# Altium PCB Industrial_IOT_Dev_Brd-v1.0.PcbDoc (part 5 of 8)
Units mil, origin at the board's own origin, x right, y up, seen from the top; angles counter-clockwise.
Board outline 6299.21 x 4724.41 mil, 4 copper layers (Top Layer, Layer 1, Layer 2, Bottom Layer), stack 62.047 mil thick; 376 components, 240 nets, 1129 pads, 635 vias.
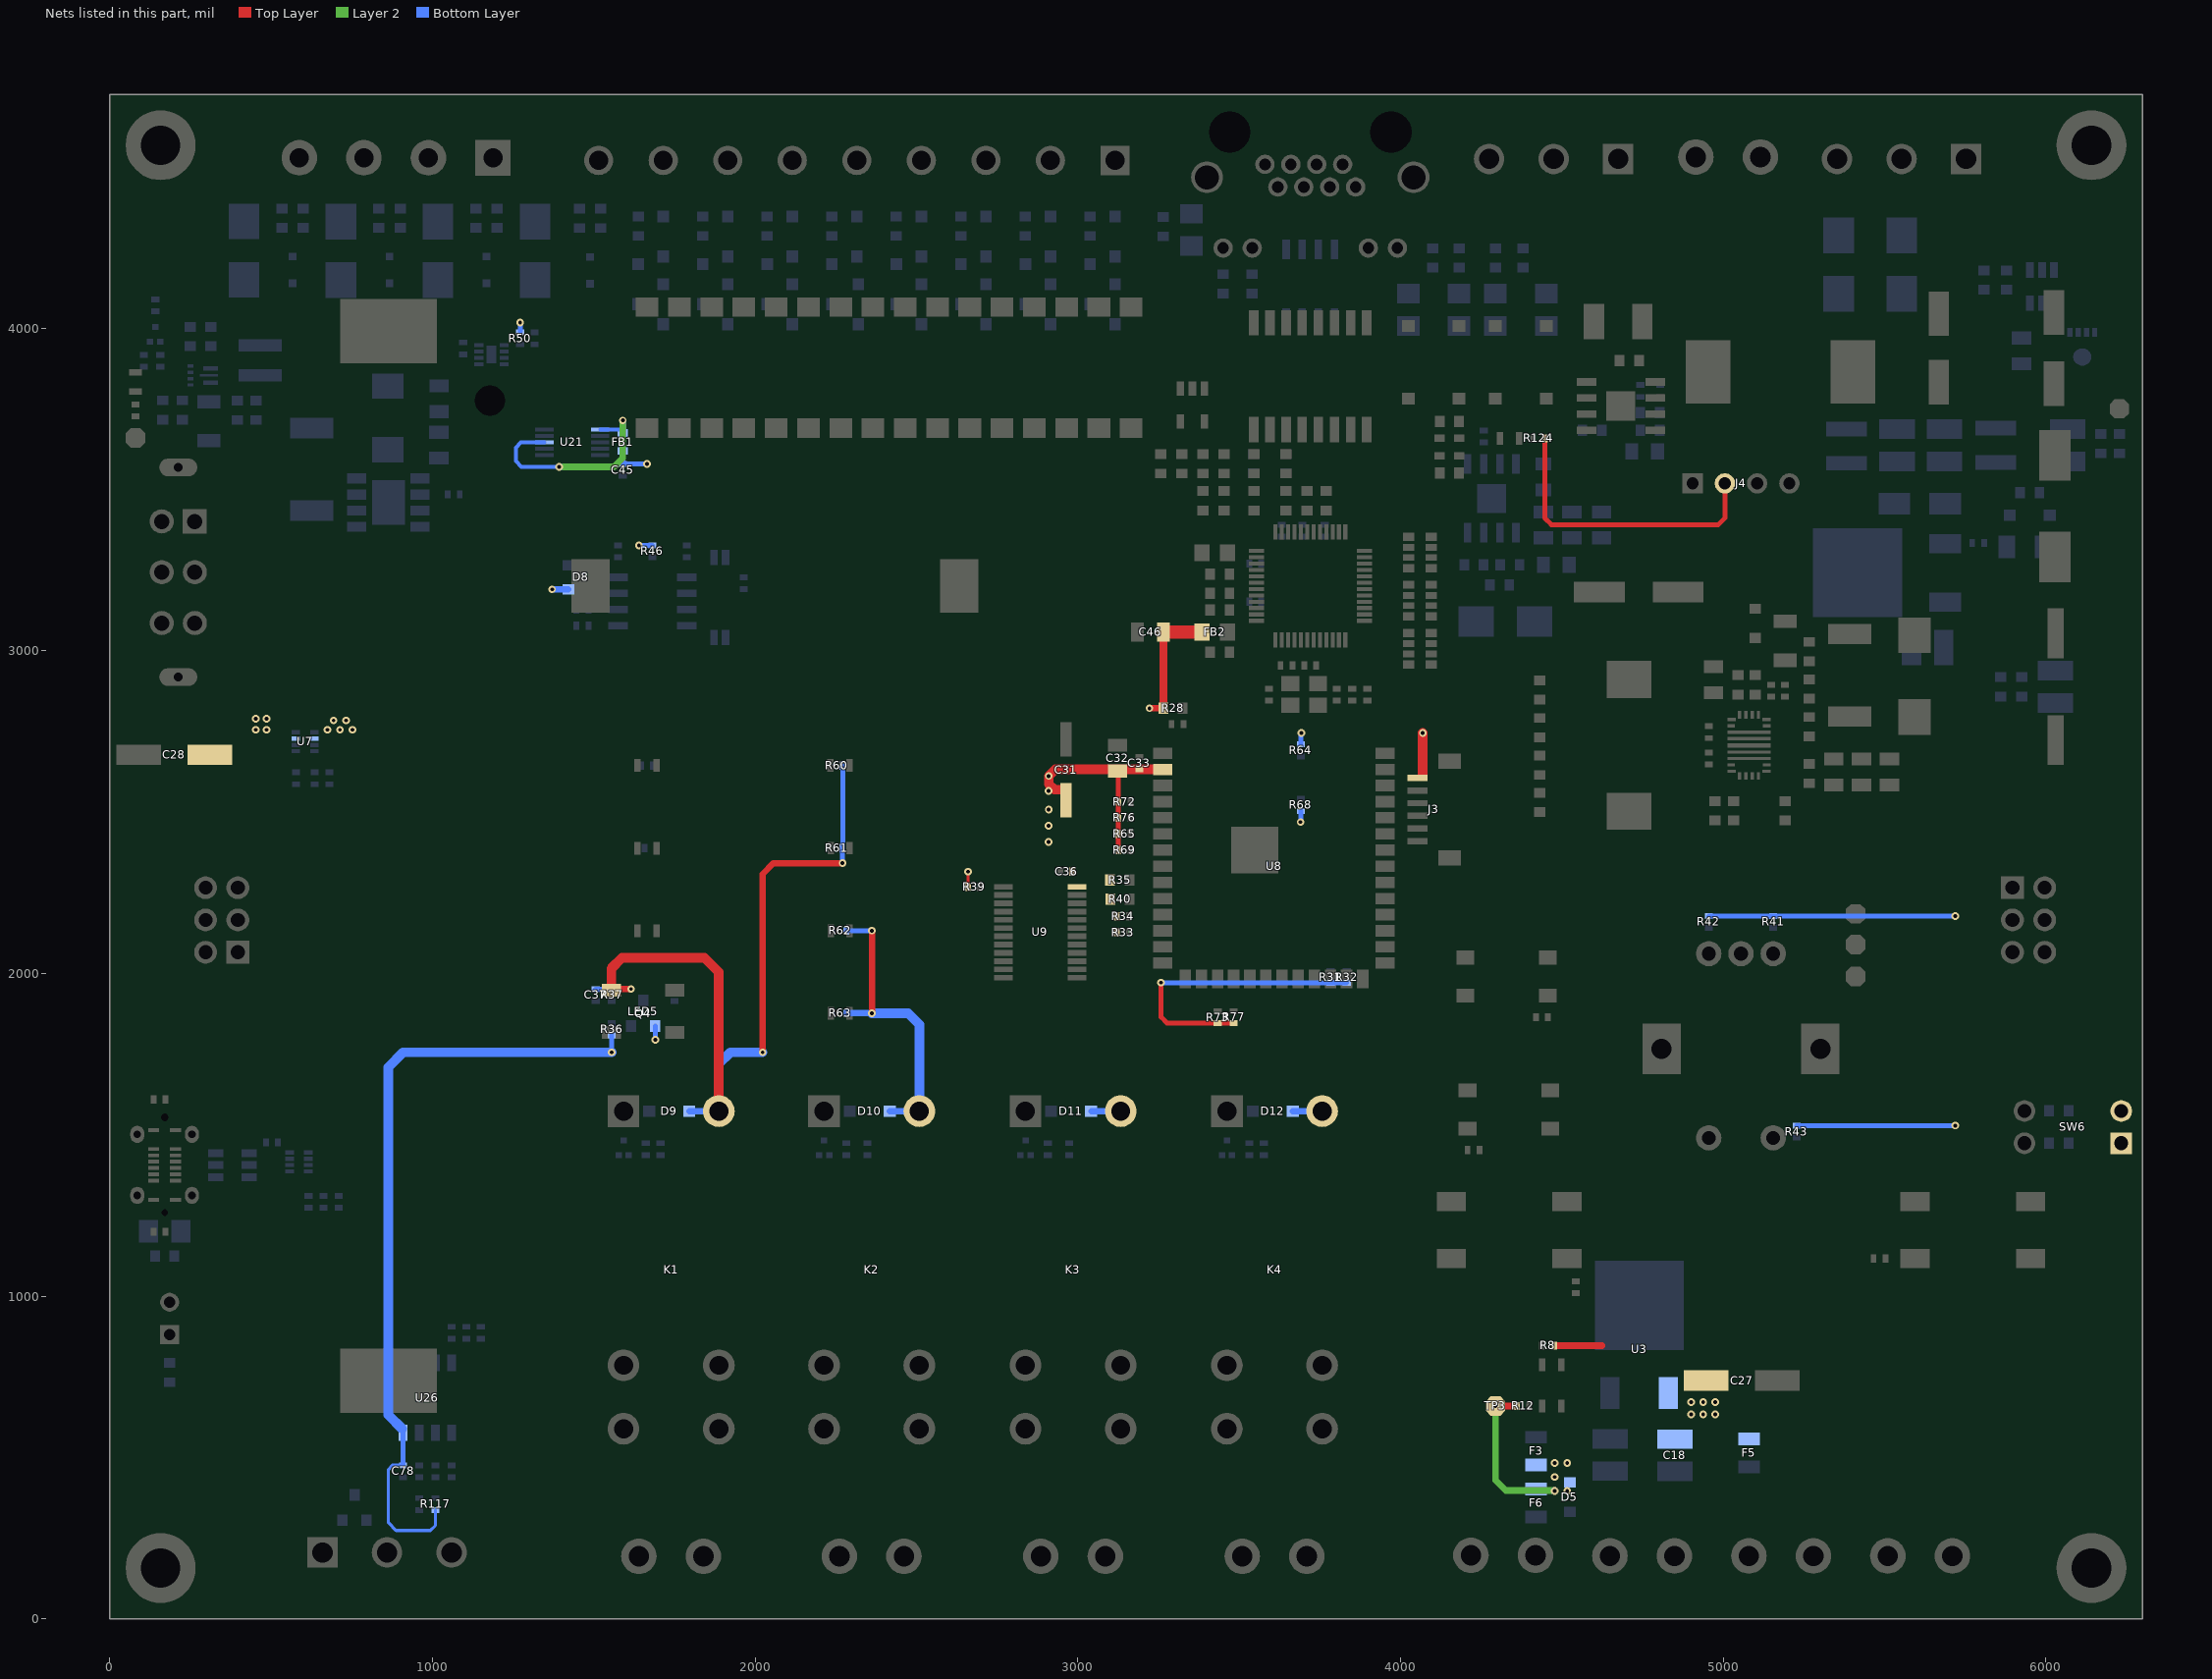
[diagram p4: the nets of this part, all layers, seen from the top]

## Part data (continued)
R103: library part RC0603FR-0712K4L, "RES SMD 12.4K OHM 1% 1/10W 0603", Case Code (Imperial)=0603, Case Code (Metric)=1608, LCSC Part Number=C137798, Manufacturer=Yageo, Max Operating Temperature=155°C, Max Power Dissipation=100mW, Min Operating Temperature=-55°C, Package Quantity=1, Resistance=12.4kR, Resistor Type="Thick Film", Supplier Part Number 1=311-12.4KHRCT-ND, Temperature Coefficient=100ppm/°C, Tolerance=1%, Voltage Rating=50V, Working Voltage=75V, Case/Package=0603, Category="Chip SMD Resistors", ComponentLink1Description=https://datasheet.ciiva.com/2454/pyu-r-int-thick-7-2454069.pdf?src-supplier=Digi-Key, ComponentLink1URL=https://datasheet.ciiva.com/2454/pyu-r-int-thick-7-2454069.pdf?src-supplier=Digi-Key, ComponentLink2Description=https://datasheet.ciiva.com/2454/pyu-r-int-thick-7-2454070.pdf?src-supplier=Digi-Key, ComponentLink2URL=https://datasheet.ciiva.com/2454/pyu-r-int-thick-7-2454070.pdf?src-supplier=Digi-Key, ComponentLink3Description=https://datasheet.ciiva.com/2454/pyu-r-int-thick-7-2454071.pdf?src-supplier=Digi-Key, ComponentLink3URL=https://datasheet.ciiva.com/2454/pyu-r-int-thick-7-2454071.pdf?src-supplier=Digi-Key, Construction=Rectangular, Depth=0.8mm, Features="Moisture Resistant", Height=0.022inch, Lead Free="Lead Free", Length=0.063inch, Manufacturer Part Number=RC0603FR-0712K4L, Military Standard=Not, Number of Terminations=2, Packaging="Tape and Reel", Power Rating=100mW, Pricing 1="1=0.10000, 10=0.02400, 100=0.00970, 1000=0.00436, 2500=0.00378 (USD)", RoHS=Yes, RoHS Compliant=Yes, Series=RC, Stock 1=494008, Supplier 1=Digi-Key, Technology="THICK FILM", Termination=SMD/SMT, Voltage Rating (DC)=50V, Width=0.031inch
R106 R112: library part RC0805FR-070RL, "RES 0 OHM JUMPER 1/8W 0805", Case Code (Imperial)=0805, Case Code (Metric)=2012, LCSC Part Number=C100045, Manufacturer=Yageo, Max Operating Temperature=155°C, Max Power Dissipation=125mW, Min Operating Temperature=-55°C, Resistance=0mR, Resistor Type="Thick Film", Tolerance=1%, Case/Package=0805, Category="Chip SMD Resistors", ComponentLink1Description=https://datasheet.ciiva.com/15189/getdatasheetpartid-348154-15189885.pdf?src-supplier=Verical, ComponentLink1URL=https://datasheet.ciiva.com/15189/getdatasheetpartid-348154-15189885.pdf?src-supplier=Verical, ComponentLink2Description=https://datasheet.ciiva.com/17042/rc0805-17042698.pdf?src-supplier=Future+Electronics, ComponentLink2URL=https://datasheet.ciiva.com/17042/rc0805-17042698.pdf?src-supplier=Future+Electronics, Construction=Rectangular, Contact Plating=Tin,Matte, Depth=1.25mm, Features="Moisture Resistant", Item Type=Resistor, Lead Free="Lead Free", Length=2mm, Manufacturer Part Number=RC0805FR-070RL, Military Standard=Not, Number of Terminations=2, Packaging="Tape and Reel", Power Rating=125mW, Pricing 1="5000=0.00281, 10000=0.00277, 20000=0.00269 (USD)", Radiation Hardening=No, RoHS=Yes, RoHS Compliant=Yes, Series=RC, Size Code=0805, Stock 1=85000, Supplier 1=Avnet, Supplier Part Number 1=RC0805FR-070RL
R108: library part 0603WAF2492T5E, "100mW Thick Film Resistors 75V ±100ppm/℃ ±1% 24.9kΩ 0603 Chip Resistor - Surface Mount ROHS", LCSC Part Number=C25962, Manufacturer="UNI-ROYAL(Uniroyal Elec)", Package=0603, ComponentLink1Description=LCSC, ComponentLink1URL=https://www.lcsc.com/product-detail/Chip-Resistor-Surface-Mount_UNI-ROYAL-Uniroyal-Elec-0603WAF2492T5E_C25962.html, Item Type=Resistor, Manufacturer Part Number=0603WAF2492T5E
R109: library part RT0805BRD07348KL, "RES SMD 348K OHM 0.1% 1/8W 0805", Case Code (Imperial)=0805, Case Code (Metric)=2012, LCSC Part Number=C865416, Manufacturer=Yageo, Max Operating Temperature=155°C, Max Power Dissipation=125mW, Min Operating Temperature=-55°C, Temperature Coefficient=25ppm/°C, Tolerance=0.1%, Voltage Rating=150V, Case/Package=0805, ComponentLink1Description=https://datasheet.ciiva.com/12705/pyu-rt-1-to-0-05-rohs-l-4-12705227.pdf?src-supplier=Mouser, ComponentLink1URL=https://datasheet.ciiva.com/12705/pyu-rt-1-to-0-05-rohs-l-4-12705227.pdf?src-supplier=Mouser, Item Type=Resistors, Manufacturer Part Number=RT0805BRD07348KL, Number of Terminations=2, Packaging="Tape and Reel", Power Rating=125mW, Pricing="1=0.16, 10=0.122, 50=0.0968, 100=0.0867, 500=0.06936, 1000=0.05814 (USD)", RoHS=Yes, RoHS Compliant=Yes, Series=RT, Stock=10028, Supplier=Digikey, Termination=SMD/SMT, Voltage Rating (DC)=150V, Width=1.25mm
R110: library part RC0603FR-0736K5L, "RES 36.5K OHM 1% 1/10W 0603", LCSC Part Number=C137738, Manufacturer=YAGEO, Package=0603, ComponentLink1Description=LCSC, ComponentLink1URL=https://www.lcsc.com/product-detail/Chip-Resistor-Surface-Mount_YAGEO-RC0603FR-0736K5L_C137738.html, Item Type=Resistor, Manufacturer Part Number=RC0603FR-0736K5L
R111: library part AC0603FR-0763R4L, "RES SMD 63.4 OHM 1% 1/10W 0603", Case Code (Imperial)=0603, Case Code (Metric)=1608, LCSC Part Number=C228004, Manufacturer=Yageo, Max Operating Temperature=155°C, Max Power Dissipation=100mW, Min Operating Temperature=-55°C, Temperature Coefficient=100ppm/°C, Tolerance=1%, Voltage Rating=50V, Case/Package=0603, ComponentLink1Description=https://datasheet.ciiva.com/12576/pyu-ac-51-rohs-l-2-12576614.pdf?src-supplier=Mouser, ComponentLink1URL=https://datasheet.ciiva.com/12576/pyu-ac-51-rohs-l-2-12576614.pdf?src-supplier=Mouser, Features="Moisture Resistant,Automotive AEC-Q200", Height=0.022inch, Item Type=Resistor, Length=0.063inch, Manufacturer Part Number=AC0603FR-0763R4L, Number of Terminations=2, Packaging="Tape and Reel", Power Rating=100mW, Pricing="1=0.1, 10=0.021, 50=0.013, 100=0.0108, 500=0.00734, 1000=0.00633 (USD)", RoHS=Yes, RoHS Compliant=Yes, Series=AC, Stock=4788, Supplier=Digikey, Termination=SMD/SMT, Weight=7.1E-05oz, Width=0.8mm
R113: library part RT0603BRD07267KL, "RES SMD 267K OHM 0.1% 1/10W 0603", Case Code (Imperial)=0603, Case Code (Metric)=1608, LCSC Part Number=C705753, Manufacturer=Yageo, Max Operating Temperature=155°C, Max Power Dissipation=100mW, Min Operating Temperature=-55°C, Temperature Coefficient=25ppm/°C, Tolerance=0.1%, Voltage Rating=75V, Voltage Rating (DC)=50V, Case/Package=0603, ComponentLink1Description=http://www.mouser.com/ds/2/447/yageodocoutput-1125656.pdf?src-supplier=Mouser, ComponentLink1URL=http://www.mouser.com/ds/2/447/yageodocoutput-1125656.pdf?src-supplier=Mouser, ComponentLink2Description=http://www.yageo.com/documents/recent/PYu-RT_1-to-0.01_RoHS_L_9.pdf?src-supplier=Digikey, ComponentLink2URL=http://www.yageo.com/documents/recent/PYu-RT_1-to-0.01_RoHS_L_9.pdf?src-supplier=Digikey, Height=0.45mm, Item Type=Resistors, Lead Free="Lead Free", Length=1.6mm, Manufacturer Part Number=RT0603BRD07267KL, Number of Terminations=2, Packaging="Tape and Reel", Power Rating=100mW, Pricing="1=0.15, 10=0.106, 50=0.0846, 100=0.0755, 500=0.05814, 1000=0.051 (USD)", RoHS=Yes, RoHS Compliant=Yes, Series=RT, Stock=12053, Supplier=Digikey, Termination=SMD/SMT, Weight=7.1E-05oz, Width=0.8mm
R114: library part RC0603FR-0712KL, "RES 12K OHM 1% 1/10W 0603", Case Code (Imperial)=0603, Case Code (Metric)=1608, LCSC Part Number=C114659, Manufacturer=Yageo, Max Operating Temperature=155°C, Max Power Dissipation=100mW, Min Operating Temperature=-55°C, Resistance Tolerance=1%, Resistor Type="Thick Film", Supplier Part Number=6276984, Temperature Coefficient=100ppm/°C, Voltage Rating=50V, Case/Package=0603, Category="Chip SMD Resistors", ComponentLink1Description=https://datasheet.ciiva.com/46412/443971-46412842.pdf?src-supplier=Element14, ComponentLink1URL=https://datasheet.ciiva.com/46412/443971-46412842.pdf?src-supplier=Element14, ComponentLink2Description=https://datasheet.ciiva.com/2454/pyu-r-int-thick-7-2454283.pdf?src-supplier=Digikey, ComponentLink2URL=https://datasheet.ciiva.com/2454/pyu-r-int-thick-7-2454283.pdf?src-supplier=Digikey, ComponentLink3Description=https://datasheet.ciiva.com/2454/pyu-r-int-thick-7-2454284.pdf?src-supplier=Digikey, ComponentLink3URL=https://datasheet.ciiva.com/2454/pyu-r-int-thick-7-2454284.pdf?src-supplier=Digikey, ComponentLink4Description=https://datasheet.ciiva.com/2454/pyu-r-int-thick-7-2454282.pdf?src-supplier=Digikey, ComponentLink4URL=https://datasheet.ciiva.com/2454/pyu-r-int-thick-7-2454282.pdf?src-supplier=Digikey, ComponentLink5Description=https://datasheet.ciiva.com/7746/1784430-7746250.pdf?src-supplier=Element14, ComponentLink5URL=https://datasheet.ciiva.com/7746/1784430-7746250.pdf?src-supplier=Element14, ComponentLink6Description=https://datasheet.ciiva.com/7746/1784430-7746251.pdf?src-supplier=Element14, ComponentLink6URL=https://datasheet.ciiva.com/7746/1784430-7746251.pdf?src-supplier=Element14, Construction=Rectangular, Depth=0.8mm, Features="Moisture Resistant", Item Type=Resistor, Lead Free=5697LeadFree, Length=1.6mm, Manufacturer Part Number=RC0603FR-0712KL, Military Standard=Not, Number of Terminations=2, Packaging="Tape and Reel", Pins=2, Power Rating=100mW, Pricing="5000=0.0028, 75000=0.0015, 100000=0.0026, 250000=0.0014, 375000=0.0025, 750000=0.0013, 1250000=0.0024, 2500000=0.0012, 5000000=0.0022 (USD)", Reach SVHC Compliant=No, RoHS=Yes, RoHS Compliant=Yes, Series=RC, Stock=15340000, Supplier="Future Electronics", Termination=SMD/SMT, Tolerance=1%, Voltage Rating (DC)=50V, Width=0.8mm
R122: library part RC0603FR-07120RL, "RES 120 OHM 1% 1/10W 0603", Case Code (Imperial)=0603, Case Code (Metric)=1608, LCSC Part Number=C114640, Manufacturer=Yageo, Max Operating Temperature=155°C, Max Power Dissipation=100mW, Min Operating Temperature=-55°C, Package Quantity=1, Resistance Tolerance=1%, Resistor Type="Thick Film", Supplier Part Number 1=311-120HRCT-ND, Temperature Coefficient=100ppm/°C, Voltage Rating=50V, Case/Package=0603, Category="Chip SMD Resistors", ComponentLink1Description=https://datasheet.ciiva.com/2553/pyu-r-int-thick-7-2553512.pdf?src-supplier=Digi-Key, ComponentLink1URL=https://datasheet.ciiva.com/2553/pyu-r-int-thick-7-2553512.pdf?src-supplier=Digi-Key, ComponentLink2Description=https://datasheet.ciiva.com/7746/443971-7746248.pdf?src-supplier=Element14, ComponentLink2URL=https://datasheet.ciiva.com/7746/443971-7746248.pdf?src-supplier=Element14, ComponentLink3Description=https://datasheet.ciiva.com/2553/pyu-r-int-thick-7-2553513.pdf?src-supplier=Digi-Key, ComponentLink3URL=https://datasheet.ciiva.com/2553/pyu-r-int-thick-7-2553513.pdf?src-supplier=Digi-Key, ComponentLink4Description=https://datasheet.ciiva.com/7746/443971-7746249.pdf?src-supplier=Element14, ComponentLink4URL=https://datasheet.ciiva.com/7746/443971-7746249.pdf?src-supplier=Element14, ComponentLink5Description=https://datasheet.ciiva.com/2553/pyu-r-int-thick-7-2553514.pdf?src-supplier=Digi-Key, ComponentLink5URL=https://datasheet.ciiva.com/2553/pyu-r-int-thick-7-2553514.pdf?src-supplier=Digi-Key, ComponentLink6Description=https://datasheet.ciiva.com/46395/443971-46395021.pdf?src-supplier=Element14, ComponentLink6URL=https://datasheet.ciiva.com/46395/443971-46395021.pdf?src-supplier=Element14, Construction=Rectangular, Depth=0.8mm, Features="Moisture Resistant", Height=0.022inch, Item Type=Resistor, Lead Free="Lead Free", Length=1.6mm, Manufacturer Part Number=RC0603FR-07120RL, Military Standard=Not, Number of Pins=2, Number of Terminations=2, Packaging="Tape and Reel", Power Rating=100mW, Pricing 1="1=0.10000, 10=0.02400, 100=0.00970, 1000=0.00436, 2500=0.00378 (USD)", REACH SVHC="No SVHC", Resistance=120R, RoHS=Yes, RoHS Compliant=Yes, Series=RC, Size Code=0603, Stock 1=839061, Supplier 1=Digi-Key, Termination=SMD/SMT, Tolerance=1%, Voltage Rating (DC)=50V, Width=0.031inch
R124: library part RC0402FR-07133RL, "RES 133 OHM 1% 1/16W 0402", Case Code (Imperial)=0402, Case Code (Metric)=1005, LCSC Part Number=C327373, Manufacturer=Yageo, Max Operating Temperature=155°C, Max Power Dissipation=63mW, Min Operating Temperature=-55°C, Power Rating=62.5mW, Resistor Type="Thick Film", Supplier Part Number 1=603-RC0402FR-07133RL, Temperature Coefficient=100ppm/°C, Tolerance=1%, Voltage Rating=50V, Case/Package=0402, Category="Chip SMD Resistors", ComponentLink1Description=https://datasheet.ciiva.com/8887/pyu-rc0402-51-rohs-l-6-8887451.pdf?src-supplier=Avnet, ComponentLink1URL=https://datasheet.ciiva.com/8887/pyu-rc0402-51-rohs-l-6-8887451.pdf?src-supplier=Avnet, Construction=Rectangular, Contact Plating=Tin,Matte, Depth=0.5mm, Features="Moisture Resistant", Height=0.016inch, Lead Free="Lead Free", Length=1mm, Manufacturer Part Number=RC0402FR-07133RL, Military Standard=Not, Number of Terminations=2, Packaging="Tape and Reel", Pricing 1="1=0.10000, 10=0.01200, 50=0.01200, 100=0.00500, 1000=0.00300, 2500=0.00200, 10000=0.00100 (USD)", Resistance=133R, RoHS=Yes, RoHS Compliant=Yes, Series=RC, Size Code=0402, Stock 1=12475, Supplier 1=Mouser, Termination=SMD/SMT, Width=0.02inch
R125: library part RC0603FR-0715KL, "RES 15K OHM 1% 1/10W 0603", Case Code (Imperial)=0603, Case Code (Metric)=1608, LCSC Part Number=C114661, Manufacturer=Yageo, Max Operating Temperature=155°C, Max Power Dissipation=100mW, Min Operating Temperature=-55°C, Package Quantity=1, Resistance Tolerance=1%, Resistor Type="Thick Film", Supplier Part Number 1=4083945, Temperature Coefficient=100ppm/°C, Voltage Rating=50V, Case/Package=0603, Category="Chip SMD Resistors", Construction=Rectangular, Depth=0.8mm, Features="Moisture Resistant", Height=0.022inch, Item Type=Resistor, Lead Free="Lead Free", Length=0.063inch, Manufacturer Part Number=RC0603FR-0715KL, Military Standard=Not, Number of Terminations=2, Packaging="Tape and Reel", Pins=2, Power Rating=100mW, Pricing 1="5000=0.00150, 50000=0.00140, 100000=0.00140, 200000=0.00140, 375000=0.00140, 625000=0.00130, 1000000=0.00130, 2000000=0.00120, 3750000=0.00120 (USD)", RoHS=Yes, RoHS Compliant=Yes, Series=RC, Stock 1=13310000, Supplier 1="Future Electronics", Termination=SMD/SMT, Tolerance=1%, Voltage Rating (DC)=50V, Width=0.031inch
R126: library part RC0603FR-0748K7L, "RES 48.7K OHM 1% 1/10W 0603", Manufacturer=Yageo, Supplier Part Number=49AK2108, Voltage Rating (DC)=50V, ComponentLink1Description=https://datasheet.ciiva.com/2454/pyu-r-int-thick-7-2454495.pdf?src-supplier=Digikey, ComponentLink1URL=https://datasheet.ciiva.com/2454/pyu-r-int-thick-7-2454495.pdf?src-supplier=Digikey, ComponentLink2Description=https://datasheet.ciiva.com/2454/pyu-r-int-thick-7-2454496.pdf?src-supplier=Digikey, ComponentLink2URL=https://datasheet.ciiva.com/2454/pyu-r-int-thick-7-2454496.pdf?src-supplier=Digikey, ComponentLink3Description=https://datasheet.ciiva.com/2454/pyu-r-int-thick-7-2454497.pdf?src-supplier=Digikey, ComponentLink3URL=https://datasheet.ciiva.com/2454/pyu-r-int-thick-7-2454497.pdf?src-supplier=Digikey, Item Type=Resistor, Lead Free=5697LeadFree, Manufacturer Part Number=RC0603FR-0748K7L, Pricing="1=0.104, 25=0.011, 50=0.009, 100=0.006 (USD)", RoHS=Yes, Stock=2423, Supplier=Avnet
R127 R128: library part RC0603FR-072R2L, "RES 2.2 OHM 1% 1/10W 0603", Case Code (Imperial)=0603, Case Code (Metric)=1608, LCSC Part Number=C112307, Manufacturer=Yageo, Max Operating Temperature=155°C, Max Power Dissipation=100mW, Min Operating Temperature=-55°C, Package Quantity=1, Resistance Tolerance=1%, Resistor Type="Thick Film", Temperature Coefficient=200ppm/°C, Voltage Rating=50V, Case/Package=0603, ComponentLink1Description=https://datasheet.ciiva.com/11808/0900766b80f96399-11808160.pdf?src-supplier=Rs, ComponentLink1URL=https://datasheet.ciiva.com/11808/0900766b80f96399-11808160.pdf?src-supplier=Rs, ComponentLink2Description=https://datasheet.ciiva.com/2554/pyu-r-int-thick-7-2554421.pdf?src-supplier=Digikey, ComponentLink2URL=https://datasheet.ciiva.com/2554/pyu-r-int-thick-7-2554421.pdf?src-supplier=Digikey, ComponentLink3Description=https://datasheet.ciiva.com/2554/pyu-r-int-thick-7-2554422.pdf?src-supplier=Digikey, ComponentLink3URL=https://datasheet.ciiva.com/2554/pyu-r-int-thick-7-2554422.pdf?src-supplier=Digikey, ComponentLink4Description=https://datasheet.ciiva.com/2554/pyu-r-int-thick-7-2554420.pdf?src-supplier=Digikey, ComponentLink4URL=https://datasheet.ciiva.com/2554/pyu-r-int-thick-7-2554420.pdf?src-supplier=Digikey, Depth=0.8mm, Features="Moisture Resistant", Height=0.022inch, Item Type=Resistors, Lead Free="Lead Free", Length=0.063inch, Manufacturer Part Number=RC0603FR-072R2L, Number of Terminations=2, Packaging="Tape and Reel", Pins=2, Power Rating=100mW, Pricing="1=0.1, 10=0.029, 50=0.0188, 100=0.0158, 500=0.01094, 1000=0.00947 (USD)", Reach SVHC Compliant=No, RoHS=Yes, RoHS Compliant=Yes, Series=RC, Stock=331140, Supplier=Digikey, Technology="THICK FILM", Termination=SMD/SMT, Tolerance=1%, Voltage Rating (DC)=50V, Width=0.031inch
RN1 RN2 RN3: library part YC164-FR-0710KL, "RES ARRAY 4 RES 10K OHM 1206", Case Code (Imperial)=1206, Case Code (Metric)=3216, LCSC Part Number=C110924, Manufacturer=Yageo, Max Operating Temperature=155°C, Min Operating Temperature=-55°C, Number of Resistors=4, Power Per Element=62.5mW, Resistance Tolerance=1%, Supplier Part Number 1=5054288, Temperature Coefficient=200ppm/°C, Voltage Rating=50V, Category="Resistor Arrays", Circuit Type=Isolated, ComponentLink1Description=http://www.farnell.com/datasheets/2167431.pdf?src-supplier=Farnell, ComponentLink1URL=http://www.farnell.com/datasheets/2167431.pdf?src-supplier=Farnell, ComponentLink2Description=https://media.digikey.com/pdf/Data%20Sheets/Yageo%20PDFs/YC102-358,TC122-164_Series_DS.pdf?src-supplier=Digi-Key, ComponentLink2URL=https://media.digikey.com/pdf/Data%20Sheets/Yageo%20PDFs/YC102-358,TC122-164_Series_DS.pdf?src-supplier=Digi-Key, ComponentLink3Description=http://www.farnell.com/datasheets/2167431.pdf?src-supplier=Element14, ComponentLink3URL=http://www.farnell.com/datasheets/2167431.pdf?src-supplier=Element14, ComponentLink4Description=http://www.farnell.com/datasheets/443424.pdf?src-supplier=Element14, ComponentLink4URL=http://www.farnell.com/datasheets/443424.pdf?src-supplier=Element14, ComponentLink5Description=http://www.farnell.com/datasheets/2167431.pdf?src-supplier=Newark, ComponentLink5URL=http://www.farnell.com/datasheets/2167431.pdf?src-supplier=Newark, Height=0.028inch, Item Type="Resistor Array", Lead Free="Lead Free", Length=0.126inch, Manufacturer Part Number=YC164-FR-0710KL, Mounting Technology="Surface Mount", Number of Circuits=4, Number of Elements=4, Packaging="Tape and Reel", Pins=8, Pricing 1="5000=0.0101, 20000=0.0095, 50000=0.0092, 125000=0.0089, 200000=0.0085 (USD)", Reach SVHC Compliant=Unknown, RoHS=Yes, RoHS Compliant=Yes, Series=YC164, Stock 1=25000, Supplier 1="Future Electronics", Tolerance=1%, Width=0.063inch
SW1: "Direct Insert 1A DPDT 24V Black 10,000 times Plugin Slide Switches ROHS", LCSC Part Number=C2848924, Manufacturer=G-Switch, Package=Plugin, ComponentLink1Description=LCSC, ComponentLink1URL=https://www.lcsc.com/product-detail/Slide-Switches_G-Switch-SS-22F07-G010_C2848924.html, Item Type=Switch, Manufacturer Part Number=SS-22F07-G010
SW2 SW3: "No NO 50mA 4.5mm 100000 260gf 12V -30℃~+85℃ 4.5mm 4.3mm Black Round Button Brick nogging SPST SMD Tactile Switches ROHS", LCSC Part Number=C381037, Manufacturer="XKB Connectivity", Package=Custom, ComponentLink1Description=LCSC, ComponentLink1URL=https://www.lcsc.com/product-detail/Tactile-Switches_XKB-Connectivity-TS-1109S-C-B_C381037.html, Item Type=Switch, Manufacturer Part Number=TS-1109S-C-B
SW4 SW5: "6mm 12mm Round Button 50mA Standing paste 6mm SPST 12V SMD,6x6mm Tactile Switches ROHS", LCSC Part Number=C455124, Manufacturer=XUNPU, Package=SMD,6x6mm, ComponentLink1Description=LCSC, ComponentLink1URL=https://www.lcsc.com/product-detail/Tactile-Switches_XUNPU-TS-1002S-12026C_C455124.html?s_z=n_TS-1002S-12026C, Item Type="Tactile Switch", Manufacturer Part Number=TS-1002S-12026C
SW6: "2 positions SPST 24V 25mA Red 3000 Times Piano Key Plugin DIP Switches ROHS", LCSC Part Number=C319071, Manufacturer="XKB Connection", Package=Plugin, ComponentLink1Description=LCSC, ComponentLink1URL=https://www.lcsc.com/product-detail/DIP-Switches_XKB-Connection-DPL-02RP_C319071.html, Item Type=SMD-4P, Manufacturer Part Number=DPL-02RP
SW7: "METAL SHAFT ENCODERS", LCSC Part Number=C361167, Manufacturer="Alps Electric", ComponentLink1Description=https://datasheet.ciiva.com/11807/0900766b80f4c221-11807942.pdf?src-supplier=Rs, ComponentLink1URL=https://datasheet.ciiva.com/11807/0900766b80f4c221-11807942.pdf?src-supplier=Rs, ComponentLink2Description=https://datasheet.ciiva.com/1310/1837001-1310650.pdf?src-supplier=Element14, ComponentLink2URL=https://datasheet.ciiva.com/1310/1837001-1310650.pdf?src-supplier=Element14, ComponentLink3Description=https://datasheet.ciiva.com/32416/03584604-32416390.pdf?src-supplier=Distrelec, ComponentLink3URL=https://datasheet.ciiva.com/32416/03584604-32416390.pdf?src-supplier=Distrelec, ComponentLink4Description=https://datasheet.ciiva.com/16204/878ec11-16204694.pdf?src-supplier=Onlinecomponents.com, ComponentLink4URL=https://datasheet.ciiva.com/16204/878ec11-16204694.pdf?src-supplier=Onlinecomponents.com, Item Type=Encoders, Lead Free=5697LeadFree, Manufacturer Part Number=EC11E1820402, Number of Positions=36NUMBER, Pricing="1=4.42, 5=3.992, 10=3.731, 25=3.4196, 40=3.1905, 80=3.00238, 230=2.74883, 440=2.57702, 945=2.4134 (USD)", RoHS=Yes, Stock=643, Supplier=Digikey
T1: "Single port 1:1 100M POE SMD-16P,12.7x7mm Pulse Transformers(LAN) ROHS", LCSC Part Number=C507597, Manufacturer=CND-tek, Package=SMD-16P,12.7x7mm, ComponentLink1Description=LCSC, ComponentLink1URL=https://jlcpcb.com/partdetail/cndtek-B1617S/C507597, Item Type=Transformer, Manufacturer Part Number=B1617S
TP1 TP2 TP3 TP4 TP5 TP6: "Test Point ON", Item Type="TEST POINT"
U1: "IC REG BUCK BOOST PROG 5A 21VQFN", LCSC Part Number=C19272254, Manufacturer="Texas Instruments", Item Type=IC, Length=5mm, Manufacturer Part Number=TPS552892RYQR, Pins=21NUMBER, Pricing="1=6.8, 10=4.8, 50=4.8, 100=4.37, 1000=3.34, 10000=3.23 (USD)", RoHS=No, Stock=3785, Supplier=Mouser, Thickness=900um, Topology=6153TopologyType, Width=3mm
U2: "OR Controller N+1 ORing Controller N-Channel 1:1 SOT-23-6", Case/Package=SOT-23-6, LCSC Part Number=C2941042, Manufacturer="Texas Instruments", Max Operating Temperature=125°C, Max Output current=5A, Max Supply Voltage=65V, Min Operating Temperature=-40°C, Min Supply Voltage=3.2V, Nominal Supply Current=80uA, Supplier Part Number=595-LM74700QDBVRQ1, Category="Power Management ICs", ComponentLink1Description=http://www.ti.com/general/docs/suppproductinfo.tsp?distId=10&amp;gotoUrl=http%3A%2F%2Fwww.ti.com%2Flit%2Fgpn%2Flm74700-q1&src-supplier=Digikey, ComponentLink1URL=http://www.ti.com/general/docs/suppproductinfo.tsp?distId=10&amp;gotoUrl=http%3A%2F%2Fwww.ti.com%2Flit%2Fgpn%2Flm74700-q1&src-supplier=Digikey, Height=1.45mm, Item Type=IC, Length=2.9mm, Manufacturer Part Number=LM74700QDBVRQ1, Mounting Technology="Surface Mount", Number of Outputs=1NUMBER, Pins=6NUMBER, Pricing="1=1.78, 10=1.6, 50=1.6, 100=1.28, 1000=0.877, 10000=0.756 (USD)", RoHS=Yes, RoHS Compliant=Yes, Series="Automotive, AEC-Q100", Stock=11505, Supplier=Mouser, Thickness=1.2mm, Turn-Off Delay Time=450ns, Turn-On Delay Time=1.4us, Width=1.6mm
U3: "IC REG LINEAR 3.3V 1.5A TO252-3", LCSC Part Number=C108723, Manufacturer=Diodes, ComponentLink1Description=http://www.mouser.com/ds/2/115/AP7363-247326.pdf?src-supplier=Mouser, ComponentLink1URL=http://www.mouser.com/ds/2/115/AP7363-247326.pdf?src-supplier=Mouser, ComponentLink2Description=https://datasheet.octopart.com/AP7363-33D-13-Diodes-Inc.-datasheet-141402625.pdf?src-supplier=Element14, ComponentLink2URL=https://datasheet.octopart.com/AP7363-33D-13-Diodes-Inc.-datasheet-141402625.pdf?src-supplier=Element14, ComponentLink3Description=http://www.diodes.com/datasheets/AP7363.pdf?src-supplier=Avnet, ComponentLink3URL=http://www.diodes.com/datasheets/AP7363.pdf?src-supplier=Avnet, ComponentLink4Description=https://www.diodes.com/assets/Datasheets/AP7363.pdf?src-supplier=Digikey, ComponentLink4URL=https://www.diodes.com/assets/Datasheets/AP7363.pdf?src-supplier=Digikey, ComponentLink5Description=https://datasheet.octopart.com/AP7363-33D-13-Diodes-Inc.-datasheet-17557726.pdf?src-supplier=SHENGYU+ELECTRONICS, ComponentLink5URL=https://datasheet.octopart.com/AP7363-33D-13-Diodes-Inc.-datasheet-17557726.pdf?src-supplier=SHENGYU+ELECTRONICS, Item Type=IC, Manufacturer Part Number=AP7363-33D-13, Pricing="1=0.92, 10=0.462, 50=0.462, 100=0.306, 1000=0.245, 10000=0.188 (USD)", RoHS=Yes, Stock=7040, Supplier=Mouser
U4: "6A 12V 150W 6V Unidirectional 5V SOT-23-6 ESD and Surge Protection (TVS/ESD) ROHS", LCSC Part Number=C2827654, Manufacturer="TECH PUBLIC", Package=SOT-23-6, ComponentLink1Description=LCSC, ComponentLink1URL=https://www.lcsc.com/product-detail/ESD-and-Surge-Protection-TVS-ESD_TECH-PUBLIC-USBLC6-2SC6_C2827654.html, Item Type=(TVS/ESD), Manufacturer Part Number=USBLC6-2SC6
U5: "8-A boost converter with 0.5-V ultra-low input voltage 7-VQFN-HR -40 to 125", LCSC Part Number=C915088, Manufacturer="Texas Instruments", Supplier Part Number 1=296-TPS61022RWURDKR-ND, Category="Voltage Regulators - Switching", ComponentLink1Description=LCSC, ComponentLink1URL=https://www.lcsc.com/product-detail/DC-DC-Converters_Texas-Instruments-TPS61022RWUR_C915088.html, Item Type=IC, Manufacturer Part Number=TPS61022RWUR, Pricing 1="1=1.88000, 10=1.68800, 25=1.59280, 100=1.35690, 250=1.27412, 500=1.11486, 1000=0.92374 (USD)", RoHS=Yes, Supplier 1=Digi-Key
U6 U7: "1.6-V TO 5.5-V, 20-M, 4-A LOW IQ", Manufacturer="Texas Instruments", Supplier Part Number=595-TPS2117DRLR, Height=600um, Item Type=IC, Length=2.1mm, Manufacturer Part Number=TPS2117DRLR, Pins=8, Pricing="1=1.34, 10=1.2, 50=1.2, 100=0.938, 1000=0.612, 10000=0.522 (USD)", RoHS=No, Stock=3415, Supplier=Mouser, Thickness=550um, Width=1.2mm
U8: "RF TXRX MOD BLUETOOTH U.FL SMD", LCSC Part Number=C3013946, Manufacturer="Espressif Systems", Item Type=IC, Manufacturer Part Number=ESP32-S3-WROOM-1U-N16R8, Pricing="1=3.9 (USD)", RoHS=No, Stock=3681, Supplier=Digikey
U9: "IC XPND 400KHZ I2C SMBUS 24TSSOP", LCSC Part Number=C130204, Manufacturer="Texas Instruments", Package=TSSOP-24, Supplier Part Number=595-TCA9535PWR, Category="Interface ICs", ComponentLink1Description=https://datasheet.ciiva.com/4826/scps201a-101401-4826418.pdf?src-supplier=Mouser, ComponentLink1URL=https://datasheet.ciiva.com/4826/scps201a-101401-4826418.pdf?src-supplier=Mouser, ComponentLink2Description=https://datasheet.ciiva.com/22652/scps201a-22652097.pdf?src-supplier=Element14, ComponentLink2URL=https://datasheet.ciiva.com/22652/scps201a-22652097.pdf?src-supplier=Element14, ComponentLink3Description=https://datasheet.ciiva.com/1780/tca9535-1780411.pdf?src-supplier=Digikey, ComponentLink3URL=https://datasheet.ciiva.com/1780/tca9535-1780411.pdf?src-supplier=Digikey, ComponentLink4Description=https://datasheet.ciiva.com/14195/tca9535-14195180.pdf?src-supplier=Avnet, ComponentLink4URL=https://datasheet.ciiva.com/14195/tca9535-14195180.pdf?src-supplier=Avnet, Height=1.2mm, Item Type=IC, Lead Free=5697LeadFree, Length=7.8mm, Manufacturer Part Number=TCA9535PWR, Pricing="1=1.22, 10=0.799, 50=0.799, 100=0.663, 1000=0.615, 10000=0.557 (USD)", RoHS=Yes, Stock=12963, Supplier=Mouser, Thickness=1mm, Width=4.4mm
U10: "IC RTC CLOCK/CALENDAR I2C 8SO", Case/Package=SO, LCSC Part Number=C80798, Manufacturer="NXP Semiconductors", Max Operating Temperature=85°C, Max Supply Voltage=5.5V, Min Operating Temperature=-40°C, Min Supply Voltage=1.8V, Temperature Grade=INDUSTRIAL, ComponentLink1Description=https://datasheet.ciiva.com/6668/pcf8563-6668170.pdf?src-supplier=Digikey, ComponentLink1URL=https://datasheet.ciiva.com/6668/pcf8563-6668170.pdf?src-supplier=Digikey, ComponentLink2Description=https://datasheet.ciiva.com/6668/pcf8563-6668166.pdf?src-supplier=Digikey, ComponentLink2URL=https://datasheet.ciiva.com/6668/pcf8563-6668166.pdf?src-supplier=Digikey, ComponentLink3Description=https://datasheet.ciiva.com/6668/pcf8563-6668174.pdf?src-supplier=Digikey, ComponentLink3URL=https://datasheet.ciiva.com/6668/pcf8563-6668174.pdf?src-supplier=Digikey, ComponentLink4Description=https://datasheet.ciiva.com/4771/pcf8563-4771994.pdf?src-supplier=Mouser, ComponentLink4URL=https://datasheet.ciiva.com/4771/pcf8563-4771994.pdf?src-supplier=Mouser, ComponentLink5Description=https://datasheet.ciiva.com/15225/getdatasheetpartid-633364-15225014.pdf?src-supplier=Verical, ComponentLink5URL=https://datasheet.ciiva.com/15225/getdatasheetpartid-633364-15225014.pdf?src-supplier=Verical, ComponentLink6Description=https://datasheet.ciiva.com/8144/pcf8563-8144541.pdf?src-supplier=Avnet, ComponentLink6URL=https://datasheet.ciiva.com/8144/pcf8563-8144541.pdf?src-supplier=Avnet, Interface=I2C, Item Type=IC, Lead Free="Lead Free", Logic Function=Clock, Manufacturer Part Number=PCF8563T/F4,118, Mounting Technology="Surface Mount", Nominal Supply Voltage=5.5V, Packaging="Tape and Reel", Pins=8, Pricing="2500=0.71 (USD)", Radiation Hardening=No, RoHS=Yes, RoHS Compliant=Yes, Stock=77500, Supplier="Future Electronics", Time Format=HH:MM:SS, Weight=0.019048oz
U11: "4V~6V Polymer 1 3.5A SOP-8-EP Battery Management ICs ROHS", LCSC Part Number=C130316, Manufacturer=SOLA-IC, Package=SOP-8-EP, ComponentLink1Description=LCSC, ComponentLink1URL=https://www.lcsc.com/product-detail/Battery-Management-ICs_SOLA-IC-SLM6600_C130316.html, Item Type=IC, Manufacturer Part Number=SLM6600
U12: "IC BATT MON LI-ION 1CELL 8TDFN", LCSC Part Number=C2682616, Manufacturer=Maxim, Max Operating Temperature=85°C, Min Operating Temperature=-20°C, Operating Supply Current=23uA, Operating Supply Voltage=4.5V, Output Voltage=400mV, Package Quantity=10000, Supplier Part Number 1=700-MAX17048G+T10, Category="Battery Management", ComponentLink1Description=https://datasheet.ciiva.com/14083/max17048-max17049-14083973.pdf?src-supplier=Digi-Key, ComponentLink1URL=https://datasheet.ciiva.com/14083/max17048-max17049-14083973.pdf?src-supplier=Digi-Key, Contact Plating=Tin,Matte, Item Type=IC, Manufacturer Part Number=MAX17048G+T10, Mount="Surface Mount", Number of Pins=8, Packaging="Tape and Reel", Pricing 1="1=3.34000, 10=3.00000, 50=2.84000, 100=2.46000, 1000=1.89000, 10000=1.83000 (USD)", Radiation Hardening=No, RoHS=Yes, RoHS Compliant=Yes, Series=ModelGauge™, Stock 1=41293, Supplier 1=Mouser
U13 U14 U15 U16 U17 U18 U19 U20: "OPTOISOLATOR 5.3KV TRANS 4SMD", LCSC Part Number=C5334420, Manufacturer=Vishay, ComponentLink1Description=https://datasheet.ciiva.com/18616/options-18616575.pdf?src-supplier=Digikey, ComponentLink1URL=https://datasheet.ciiva.com/18616/options-18616575.pdf?src-supplier=Digikey, Item Type=IC, Manufacturer Part Number=SFH617A-2X009T, Pricing="1=0.3234, 10=0.3216, 25=0.3197, 100=0.3179, 250=0.3161, 500=0.3142 (USD)", RoHS=Yes, Stock=871, Supplier="Arrow Electronics"
U21: "IC ADC 16BIT SIGMA-DELTA 10VSSOP", Case/Package=VSSOP, LCSC Part Number=C37593, Manufacturer="Texas Instruments", Max Operating Temperature=125°C, Max Supply Voltage=5.5V, Min Operating Temperature=-40°C, Min Supply Voltage=2V, Nominal Supply Current=150uA, Package Quantity=2500, Power Dissipation=900uW, Supplier Part Number=595-ADS1115IDGSR, Category="Analog to Digital Converters (ADCs)", ComponentLink1Description=https://datasheet.ciiva.com/4031/47725463s8438921n7713-4031028.pdf?src-supplier=Arrow+Electronics, ComponentLink1URL=https://datasheet.ciiva.com/4031/47725463s8438921n7713-4031028.pdf?src-supplier=Arrow+Electronics, Contact Plating=Gold, Conversion Rate=0.86KS/s, Height=1.07mm, Integral Nonlinearity (INL)=1LSB, Interface=I2C, Item Type=IC, Lead Free="Lead Free", Length=3mm, Manufacturer Part Number=ADS1115IDGSR, Max Supply Voltage (DC)=5.5V, Min Supply Voltage (DC)=2V, Number of A/D Converters=1, Number of Bits=16, Number of Channels=2, Number of Converters=1, Number of Inputs=4, Packaging="Tape and Reel", Pins=10, Polarity=Bipolar, Pricing="1=5.44, 10=4.76, 50=4.76, 100=4.01, 1000=2.88, 10000=2.78 (USD)", Reach SVHC Compliant=No, Resolution=16b, RoHS=Yes, RoHS Compliant=Yes, Sampling Rate=860S/s, Series=-, Stock=5925, Supplier=Mouser, Supply Type=Single, Thickness=1.02mm, Width=3mm
U22: "SPI LQFP-48(7x7) Ethernet ICs ROHS", LCSC Part Number=C32843, Manufacturer=WIZNET, Package=LQFP-48(7x7), ComponentLink1Description=LCSC, ComponentLink1URL=https://www.lcsc.com/product-detail/Ethernet-ICs_WIZNET-W5500_C32843.html, Item Type=IC, Manufacturer Part Number=W5500
U23: "TVS DIODE 5.5VWM 8.5VC SOT23-5", Breakdown Voltage=5.5V, Case/Package=SOT-23, Clamping Voltage=7.8V, Clamping Voltage-Max=8V, LCSC Part Number=C10675, Leakage Current=100nA, Manufacturer=Littelfuse, Max Operating Temperature=85°C, Max Power Dissipation=225mW, Min Operating Temperature=-40°C, Power Line Protection=No, Supplier Part Number 1=3283009, Voltage Rating (DC)=5V, Category="TVS Diodes", ComponentLink1Description=https://datasheet.ciiva.com/15143/getdatasheetpartid-152299-15143806.pdf?src-supplier=Verical, ComponentLink1URL=https://datasheet.ciiva.com/15143/getdatasheetpartid-152299-15143806.pdf?src-supplier=Verical, ComponentLink2Description=https://datasheet.ciiva.com/4509/sp05x-leadfree-4509638.pdf?src-supplier=Mouser, ComponentLink2URL=https://datasheet.ciiva.com/4509/sp05x-leadfree-4509638.pdf?src-supplier=Mouser, ComponentLink3Description=https://datasheet.ciiva.com/22697/1911798-22697943.pdf?src-supplier=Element14, ComponentLink3URL=https://datasheet.ciiva.com/22697/1911798-22697943.pdf?src-supplier=Element14, ComponentLink4Description=https://datasheet.ciiva.com/8062/littefuse-spa-sp050x-8062425.pdf?src-supplier=Element14, ComponentLink4URL=https://datasheet.ciiva.com/8062/littefuse-spa-sp050x-8062425.pdf?src-supplier=Element14, ComponentLink5Description=https://datasheet.ciiva.com/332/sp05xxba-332619.pdf?src-supplier=Digi-Key, ComponentLink5URL=https://datasheet.ciiva.com/332/sp05xxba-332619.pdf?src-supplier=Digi-Key, ComponentLink6Description=https://datasheet.ciiva.com/332/sp05xxba-332620.pdf?src-supplier=Digi-Key, ComponentLink6URL=https://datasheet.ciiva.com/332/sp05xxba-332620.pdf?src-supplier=Digi-Key, ComponentLink7Description=https://datasheet.ciiva.com/16393/sp05xxba-16393404.pdf?src-supplier=Future+Electronics, ComponentLink7URL=https://datasheet.ciiva.com/16393/sp05xxba-16393404.pdf?src-supplier=Future+Electronics, ComponentLink8Description=https://datasheet.ciiva.com/332/sp05xxba-332621.pdf?src-supplier=Digi-Key, ComponentLink8URL=https://datasheet.ciiva.com/332/sp05xxba-332621.pdf?src-supplier=Digi-Key, ComponentLink9Description=https://datasheet.ciiva.com/1268/526672-1268494.pdf?src-supplier=Element14, ComponentLink9URL=https://datasheet.ciiva.com/1268/526672-1268494.pdf?src-supplier=Element14, Depth=1.75mm, Diode Type=ZENER, Direction=Unidirectional, ESD Protection=Yes, Height=1.3mm, Item Type="TVS Diode", Lead Free="Lead Free", Length=3.05mm, Manufacturer Part Number=SP0504BAHTG, Max Reverse Leakage Current=100nA, Mounting Technology="Surface Mount", Number of Channels=4, Number of Elements=4, Number of Unidirectional Channels=4, Packaging="Tape and Reel", Peak Pulse Power=225mW, Pins=5, Polarity=Bidirectional,Unidirectional, Power Dissipation=225mW, Pricing 1="1=0.78, 15=0.685, 75=0.625, 300=0.575, 1500=0.52 (USD)", Radiation Hardening=No, Reach SVHC Compliant=Unknown, Reverse Standoff Voltage=5.5V, RoHS=Yes, RoHS Compliant=Yes, Series="SP05, SPA®", Stock 1=1611, Supplier 1="Future Electronics", Termination=SMD/SMT, Width=1.75mm, Working Voltage=5.5V
U24: "IC REG BCK SPLIT RAIL ADJ 8SOPWR", LCSC Part Number=C2072188, Manufacturer="Texas Instruments", Max Supply Voltage=60V, Min Supply Voltage=4.5V, Nominal Supply Current=146uA, Supplier Part Number=595-TPS54560BQDDARQ1, ComponentLink1Description=http://www.ti.com/lit/ds/symlink/tps54560b-q1.pdf?src-supplier=Digikey, ComponentLink1URL=http://www.ti.com/lit/ds/symlink/tps54560b-q1.pdf?src-supplier=Digikey, Height=1.7mm, Item Type=IC, Length=4.89mm, Manufacturer Part Number=TPS54560BQDDARQ1, Pricing="1=6.41, 10=5.44, 50=5.44, 100=4.7, 1000=3.4, 10000=3.29 (USD)", RoHS=Yes, Stock=1171, Supplier=Mouser, Thickness=1.48mm, Width=3.9mm
U25: "IEEE 802.3at PoE High-Power PD interface with AUX Control 8-SO PowerPAD -40 to 85", LCSC Part Number=C337500, Manufacturer="Texas Instruments", Supplier Part Number=595-TPS2378DDAR, Category="Interface ICs", ComponentLink1Description=https://datasheet.ciiva.com/6632/tps2378-6632081.pdf?src-supplier=Digikey, ComponentLink1URL=https://datasheet.ciiva.com/6632/tps2378-6632081.pdf?src-supplier=Digikey, ComponentLink2Description=https://datasheet.ciiva.com/26931/getdatasheetpartid-621225-26931136.pdf?src-supplier=Verical, ComponentLink2URL=https://datasheet.ciiva.com/26931/getdatasheetpartid-621225-26931136.pdf?src-supplier=Verical, Item Type=IC, Lead Free=5697LeadFree, Manufacturer Part Number=TPS2378DDAR, Pricing="1=1.61, 10=1.08, 50=1.08, 100=0.955, 1000=0.801, 10000=0.664 (USD)", RoHS=Yes, Stock=2078, Supplier=Mouser, Thickness=1.48mm, Width=3.9mm
U26: "SOP-8 RS-485/RS-422 ICs ROHS", LCSC Part Number=C519086, Manufacturer=HGSEMI, Package=SOP-8, ComponentLink1Description=LCSC, ComponentLink1URL=https://www.lcsc.com/product-detail/RS-485-RS-422-ICs_HGSEMI-SP3485EIM-TR_C519086.html, Item Type=IC, Manufacturer Part Number=SP3485EIM/TR
X1: library part Q13MC14620001, "32.768kHz 7pF ±20ppm MC-146 Crystals ROHS", LCSC Part Number=C3013800, Manufacturer="Seiko Epson", Package=MC-146, ComponentLink1Description=LCSC, ComponentLink1URL=https://www.lcsc.com/product-detail/Crystals_Seiko-span-style-background-color-ff0-Epson-span-Q13MC14620001_C3013800.html, Item Type=Crystals, Manufacturer Part Number=Q13MC14620001
X2: library part X322525MRB4SI, "25MHz 贴片晶振 18pF ±10ppm ±20ppm SMD3225-4P Crystals ROHS", LCSC Part Number=C70593, Manufacturer=YXC, Item Type=Crystal, Manufacturer Part Number=X322525MRB4SI, RoHS=No, Supplier=LCSC

## Free pads (board coordinates)
  round 216.54 hole 122.05: MH1(157.85,157.85) MH1(157.85,4566.56) MH1(6141.36,4566.56) MH1(6141.37,157.85)

## Via types
v1: diameter 23.62, hole 11.81, Top Layer to Bottom Layer, tented both sides, 635 vias

## Nets (pads, with @x,y where several pads share a name; then routed paths per layer and width w, separated by ;. In a path a pad name is that pad's centre, name@x,y a point inside that pad or via, vN(x,y) a via of type N, cw(c..) or ccw(c..) an arc to the next point about the centre after c; other vN are vias at no path point)
3V3: C31.1 C32.2 C33.1 C36.1 C45.1 C46.2 C78.1 D5.2 D8.1 F3.2 F6.1 FB1.2 FB2.1 J3.1 J4.2 Q4.1 R12.1 R28.2 R31.2 R32.2 R33.2 R34.2 R35.2 R36.2 R39.2 R40.2 R41.2 R42.2 R43.2 R46.2 R50.1 R64.2 R65.2 R68.2 R69.2 R72.2 R73.2 R76.2 R77.2 R117.1 R124.1 SW6.1 SW6.2 TP3.1 U8.2 U9.24 U26.8 | length 7654.5
  Top Layer w10: R39.2@2659.72,2268.08 v1@2659.72,2313.67 ; J3.1@4050,2609.62 J3.1@4053.02,2606.6
  Top Layer w15: R69.2@3126.08,2382.53 R76.2@3126.08,2482.53 R72.2@3126.08,2532.03 C32.2@3126.08,2631.92 ; v1(3258.02,1971.84) 3258.02,1865 3276.55,1846.47 R77.2@3483.1,1846.47 ; R124.1@4447,3658.19 4447,3411.71 4467.68,3391.03 4985.03,3391.03 5005.1,3411.1 J4.2@5005.1,3518.73
  Top Layer w20: v1(3222,2822) R28.2@3265,2822 ; TP3.1@4322.81,659.96 R12.1@4356.53,659.96
  Top Layer w25: R28.2@3265,2822 C46.2@3265,3057.97
  Top Layer w30: C31.1@2963.57,2531.83 C31.1@2963.57,2536.83 2963.57,2566.66 2960.66,2569.57 2927.57,2569.57 2910,2587.15 v1(2910,2612) 2930.53,2632.53 C33.1@3189.85,2632.53 ; C33.1@3190.72,2632.53 U8.2@3263.29,2632.53 ; J3.1@4069,2612.24 v1(4069,2745.28)
  Top Layer w40: C46.2@3265,3057.97 FB2.1@3385.44,3057.97
  Layer 2 w20: v1(4294.48,659.96) 4294.48,429.87 4326.19,398.16 4476.7,398.16 v1(4478.15,396.72)
  Bottom Layer w10: C78.1@909.46,476.09 876.36,476.12 863.5,463.25 863.5,298.1 887.45,274.14 993.49,274.14 1009.46,290.11 R117.1@1009.46,337.5 ; R64.2@3691,2710 R64.2@3691.77,2710.77 ; v1@3691.77,2744.52 v1(3692.53,2745.28)
  Bottom Layer w15: C78.1@909.46,476.09 U26.8@909.46,576.86 ; R50.1@1272,3989.72 v1(1272,4017.34) ; v1(1555.74,1755.74) R36.2@1555.74,1808.77 ; FB1.2@1590,3620.53 FB1.2@1590,3619.53 C45.1@1590,3579 v1(1664.87,3579) ; v1(1640,3326.86) R46.2@1681.69,3326.86 ; v1(1690.56,1794.43) Q4.1@1690.56,1837.4 ; v1(3258.02,1971.84) 3259.2,1970.67 R31.2@3783.55,1970.67 R32.2@3833.55,1970.67 ; v1@3691,2470.25 R68.2@3691,2504 ; R64.2@3691.77,2710.77 v1@3691.77,2744.52 ; R42.2@4955.1,2178.5 4955.35,2178.25 5718.75,2178.25 v1(5719,2178) ; R43.2@5227.5,1528.33 5227.83,1528.67 5718.67,1528.67 v1(5719,1529)
  Bottom Layer w20: v1(1371.05,3190.46) D8.1@1421.26,3190.46
  Bottom Layer w30: U26.8@906.66,589.03 863.72,631.97 863.72,1710 909.45,1755.74 v1(1555.74,1755.74)
  other v1: 4516.43,396.72 4478.15,440 4478.15,483.28 4516.43,483.28 2659.72,2315.69 2909.54,2408 2909.54,2458 3690.23,2469.48 2910,2508 2909.54,2565.57
3V3-FIL: FB1.1 U21.1 U21.8 | length 712.7
  Layer 2 w20: v1(1392.85,3570) 1562.73,3570 1590,3597.27 v1(1590,3714)
  Bottom Layer w12: U21.8@1346.91,3646.27 1346.82,3646.18 1274.77,3646.18 1258.42,3629.84 1258.42,3587.57 1275.99,3570 v1(1392.85,3570) ; U21.1@1520.14,3685.64 FB1.1@1590,3685.64
  Bottom Layer w20: FB1.1@1590,3675.64 1590,3685.64 v1(1590,3714)
5V: C18.2 C27.1 C28.1 C37.1 D9.2 D10.2 D11.2 D12.2 F5.1 K1.8 K2.8 K3.8 K4.8 LED5.1 R8.1 R37.2 R60.2 R61.2 R62.2 R63.2 U3.1 U7.2 U7.7 | length 3791.3
  Top Layer w20: LED5.1@1565,1952 v1(1615.76,1952) ; v1(2023.25,1756) 2023.25,2308.25 2057,2342 v1(2271,2342) ; v1(2362.14,1877) v1(2362.14,2132.79) ; R8.1@4479.34,847 4624,847
  Top Layer w30: LED5.1@1554.73,1947.73 1554.73,2015.83 1587.9,2049 1842.74,2049 1887.58,2004.15 K1.8@1887.58,1573.63
  Bottom Layer w15: C37.1@1505.83,1951.8 1505.93,1951.9 1555.64,1951.9 R37.2@1555.74,1952 v1(1615.76,1952) ; v1(2271,2342) R61.2@2271,2389 ; R60.2@2270.98,2644.58 2271.49,2645.09 R61.2@2271.49,2388.62 ; R62.2@2282.21,2132.79 v1(2362.14,2132.79)
  Bottom Layer w20: D9.2@1796.75,1573.63 K1.8@1887.58,1573.63 ; R63.2@2284.04,1876.95 2362.08,1876.95 v1(2362.14,1877) ; D10.2@2418.1,1573.63 K2.8@2508.94,1573.63 ; D11.2@3042.25,1573.63 K3.8@3133.09,1573.63 ; D12.2@3666.4,1573.62 K4.8@3757.23,1573.63
  Bottom Layer w30: K1.8@1887.58,1573.63 1887.58,1720.1 1923.48,1756 v1(2023.25,1756) ; v1(2362.14,1877) 2474,1877 2508.94,1842.06 K2.8@2508.94,1573.63
  other v1: 4900.63,634 4938,634 4975.37,634 4900.63,672.28 4938,672.28 4975.37,672.28 452.4,2755.37 486.49,2755.37 674.86,2755.37 713.43,2755.37 752,2755.37 693.87,2784.14 732.44,2784.14 452.4,2789.46 486.49,2789.46